# Altium PCB demo-board.PcbDoc
Units mil, origin at the board's own origin, x right, y up, seen from the top; angles counter-clockwise.
Board outline 3100 x 1700 mil, 2 copper layers (Top, Bottom), stack 0 mil thick; 8 components, 0 nets, 30 pads, 0 vias.
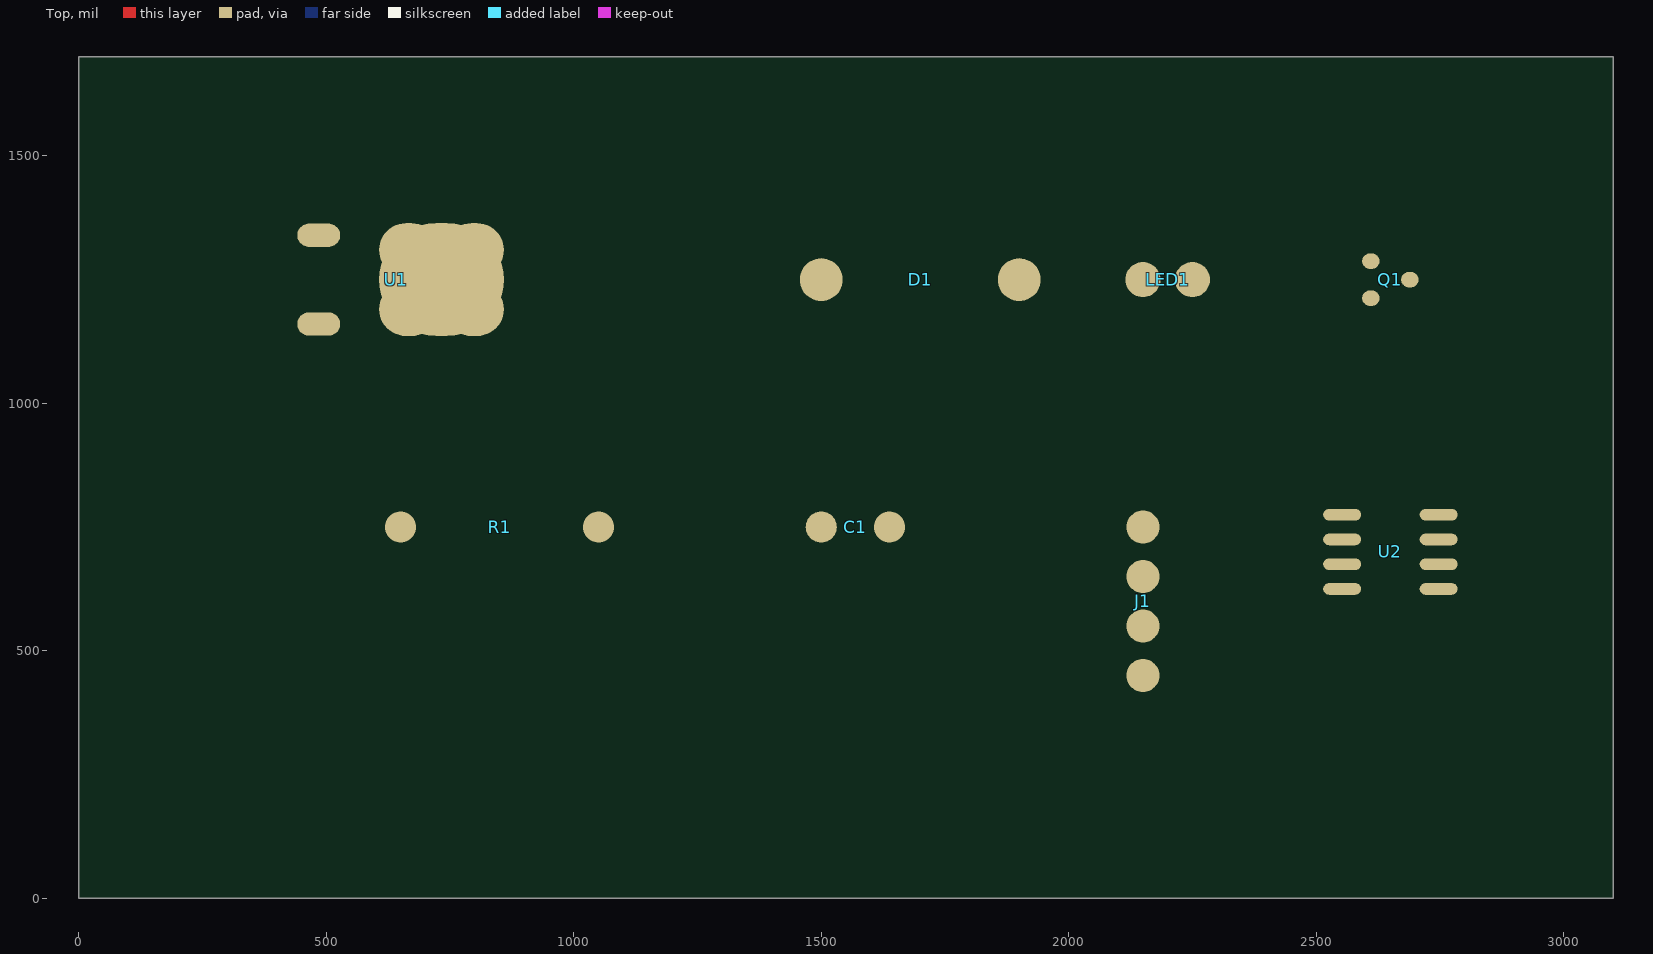
[diagram p0: Top view]
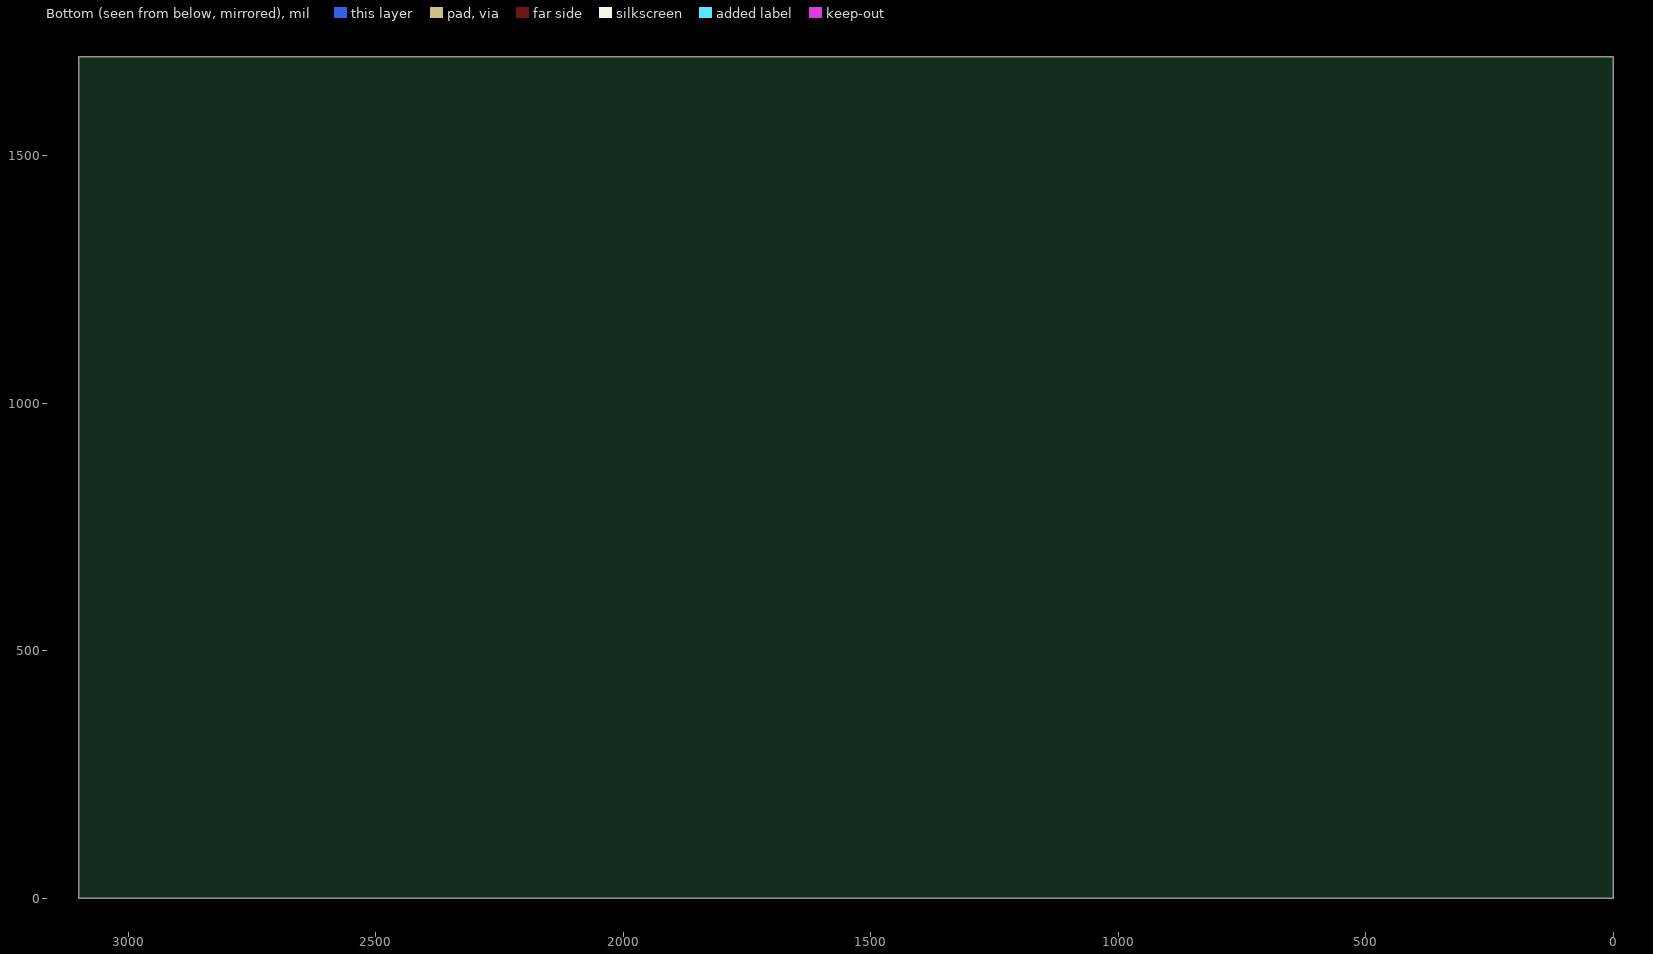
[diagram p1: Bottom view, seen from below]

## Layer stack, top to bottom

## Board outline
0,0 3100,0 3100,1700 0,1700

## Components (designator, comment, footprint, x,y, rotation, side; value= is the part's Value field where it differs from the comment)
C1 "" CAP-8x12 1500,750 r0 top
D1 "" DO41 1500,1250 r0 top
J1 "" HDR1X4 2150,750 r0 top
LED1 "" LED5 2150,1250 r0 top
Q1 "" SOT23 2650,1250 r0 top
R1 "" AXIAL-0.4 650,750 r0 top
U1 "" DPAK 650,1250 r0 top
U2 "" SO8 2650,700 r0 top

## Footprints (in the part's own frame and the unit in brackets; to place one, negate y for a bottom-side part, rotate by r counter-clockwise, add the part's x,y. Pads: shape width x height; smd on the part's side, far side on the other; paste and mask are expansions set on the pad)
AXIAL-0.4 [mm]
  round 1.6 smd: 1(0,0) 2(10.16,0)
CAP-8x12 [mm]
  round 1.6 smd: 1(0,0) 2(3.5,0)
DO41 [mm]
  round 2.2 smd: 1(0,0) 2(10.16,0)
DPAK [mm]
  oval 2.2x1.2 smd: 1(-4.2,2.28) 3(-4.2,-2.28)
  oval 6.4x5.8 smd: 2(2.1,0)
  oval 3.05x2.75 smd: ""(0.425,-1.525) ""(0.425,1.525) ""(3.775,-1.525) ""(3.775,1.525)
HDR1X4 [mm]
  round 1.7 smd: 1(0,0) 2(0,-2.54) 3(0,-5.08) 4(0,-7.62)
LED5 [mm]
  round 1.8 smd: 1(0,0) 2(2.54,0)
SO8 [mm]
  oval 1.95x0.6 smd: 1(-2.475,1.905) 2(-2.475,0.635) 3(-2.475,-0.635) 4(-2.475,-1.905) 5(2.475,-1.905) 6(2.475,-0.635) 7(2.475,0.635) 8(2.475,1.905)
SOT23 [mm]
  oval 0.9x0.8 smd: 1(-1,0.95) 2(-1,-0.95) 3(1,0)

## Nets (pads, with @x,y where several pads share a name; then routed paths per layer and width w, separated by ;. In a path a pad name is that pad's centre, name@x,y a point inside that pad or via, vN(x,y) a via of type N, cw(c..) or ccw(c..) an arc to the next point about the centre after c; other vN are vias at no path point)
pads on no net: C1.1 C1.2 D1.1 D1.2 J1.1 J1.2 J1.3 J1.4 LED1.1 LED1.2 Q1.1 Q1.2 Q1.3 R1.1 R1.2 U1. U1.1 U1.2 U1.3 U2.1 U2.2 U2.3 U2.4 U2.5 U2.6 U2.7 U2.8